# Altium PCB MainBoardPCB_4.PcbDoc (part 31 of 32)
Units mm, origin at the board's own origin, x right, y up, seen from the top; angles counter-clockwise.
Board outline 333.63 x 349.38 mm, 16 copper layers (L1, L2 (GND), L3 (Sign), L4 (GND), L5 (Sign), L6 (PWR/GND), L7(PWR/GND), L8 (Plane_GND), L9 (PWR/GND), L10 (PWR/GND), L11 (PWR/GND), L12 (Sign), L13 (GND), L14 (Sign), L15 (GND), L16), stack 2.502 mm thick; 2205 components, 1648 nets, 8314 pads, 3172 vias.
Unrouted connection lines stored in the file: 5141.
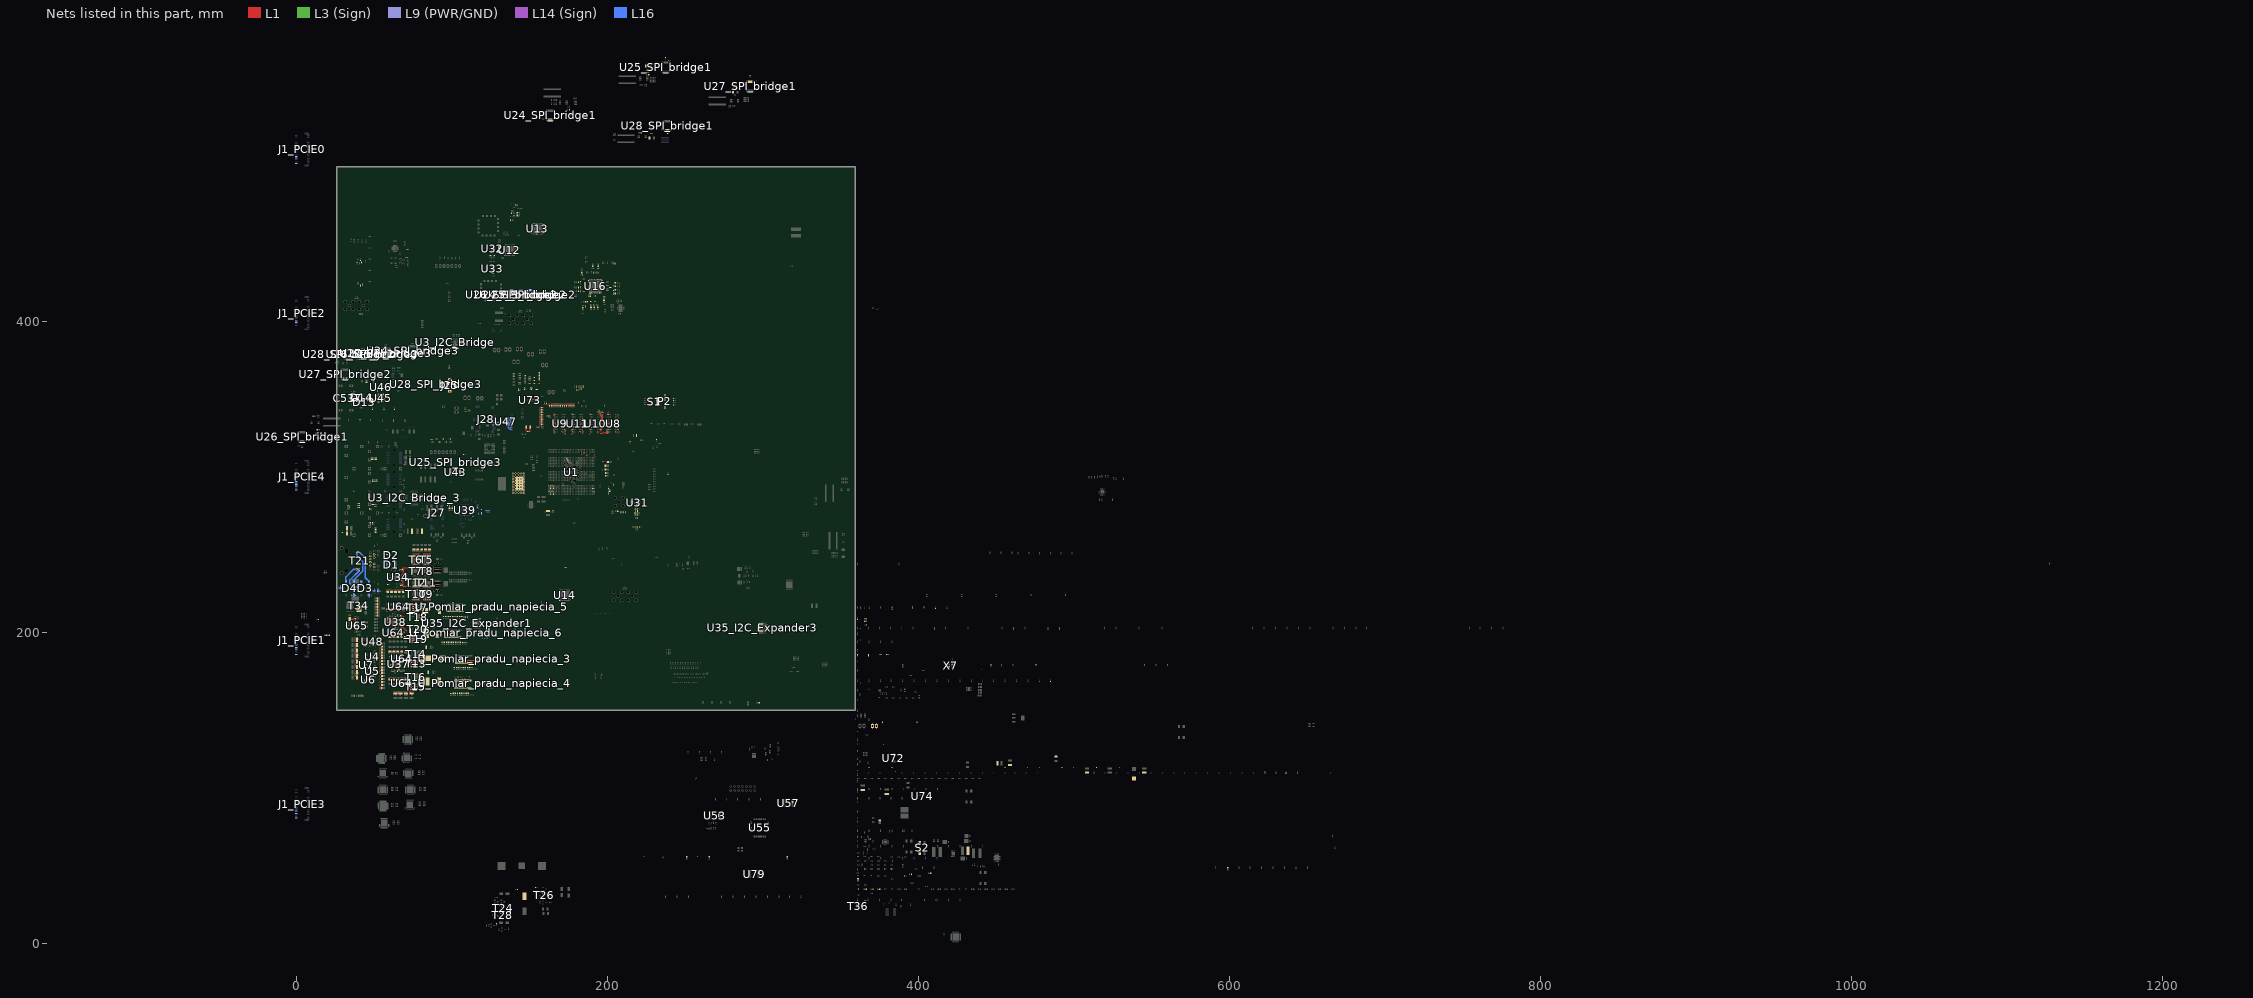
[diagram p31: the nets of this part, all layers, seen from the top]

## Via types
v1: diameter 0.5, hole 0.2, L1 to L16, tented both sides, 1153 vias
v2: diameter 0.5/0.35/0.35/0.35/0.35/0.35/0.35/0.35/0.35/0.35/0.35/0.35/0.35/0.35/0.35/0.5 (per signal layer), hole 0.2, L1 to L16, tented both sides, 548 vias
v3: diameter 0.5, hole 0.2, L1 to L16, 522 vias
v4: diameter 0.5/0.35/0.35/0.35/0.35/0.35/0.35/0.35/0.35/0.35/0.35/0.35/0.35/0.35/0.35/0.5 (per signal layer), hole 0.15, L1 to L16, tented both sides, 266 vias
v5: diameter 0.8, hole 0.4, L1 to L16, tented both sides, 164 vias
v6: diameter 0.35/0/0.35 (per signal layer), hole 0.127, L1 to L3 (Sign), tented both sides, 132 vias
v7: diameter 2.54, hole 1.02, L1 to L16, 125 vias
v8: diameter 1.4, hole 0.5, L1 to L16, tented both sides, 80 vias
v9: diameter 0.35, hole 0.127, L1 to L2 (GND), tented both sides, 36 vias
v10: diameter 0.4, hole 0.2, L1 to L16, 16 vias
v11: diameter 0.25, hole 0.2, L1 to L16, 16 vias
v12: diameter 5, hole 3, L1 to L16, 15 vias
v13: diameter 0.3, hole 0.2, L1 to L16, 15 vias
v14: diameter 0.45, hole 0.15, L1 to L16, 12 vias
v15: diameter 0.5/0.35/0.35/0.35/0.35/0.35/0.35/0.35/0.35/0.35/0.35/0.35/0.35/0.35/0.35/0.45 (per signal layer), hole 0.15, L1 to L16, tented both sides, 10 vias
v16: diameter 0.2/0/0.2 (per signal layer), hole 0.1, L1 to L3 (Sign), tented both sides, 9 vias
v17: diameter 0.4, hole 0.1, L1 to L16, 7 vias
v18: diameter 0.5, hole 0.2, L3 (Sign) to L6 (PWR/GND), tented both sides, 6 vias
v19: diameter 1.65, hole 1.65, L1 to L16, 6 vias
v20: diameter 1.15, hole 1.15, L1 to L16, 6 vias
v21: diameter 0.35/0/0.35 (per signal layer), hole 0.127, L14 (Sign) to L16, tented both sides, 5 vias
v22: diameter 0.2, hole 0.1, L1 to L16, 4 vias
v23: diameter 0.4, hole 0.2, L1 to L16, tented both sides, 2 vias
v24: diameter 0.4, hole 0.15, L1 to L16, 2 vias
v25: diameter 0.508, hole 0.127, L1 to L2 (GND), 2 vias
v26: diameter 0.508, hole 0.127, L2 (GND) to L3 (Sign), 2 vias
v27: diameter 0.5/0.35/0.35/0.35/0.35/0.35/0.35/0.35/0.35/0.35/0.35/0.35/0.35/0.35/0.35/0.5 (per signal layer), hole 0.15, L1 to L16, 2 vias
v28: diameter 0.35, hole 0.127, L3 (Sign) to L6 (PWR/GND), tented both sides, 2 vias
v29: diameter 5.5, hole 3.5, L1 to L16, 1 vias
v30: diameter 0.5/0.35/0.35/0.35/0.35/0.35/0.35/0.35/0.35/0.35/0.35/0.35/0.35/0.35/0.35/0.5 (per signal layer), hole 0.2, L1 to L16, 1 vias
v31: diameter 0.35/0.35/0.35 (per signal layer), hole 0.127, L1 to L3 (Sign), tented both sides, 1 vias
v32: diameter 0.45/0/0.45 (per signal layer), hole 0.15, L1 to L3 (Sign), tented both sides, 1 vias
v33: diameter 0.45/0/0.45 (per signal layer), hole 0.2, L14 (Sign) to L16, tented both sides, 1 vias
v34: diameter 0.35, hole 0.127, L2 (GND) to L3 (Sign), 1 vias
v35: diameter 0.35, hole 0.127, L1 to L2 (GND), 1 vias

## Nets (pads, with @x,y where several pads share a name; then routed paths per layer and width w, separated by ;. In a path a pad name is that pad's centre, name@x,y a point inside that pad or via, vN(x,y) a via of type N, cw(c..) or ccw(c..) an arc to the next point about the centre after c; other vN are vias at no path point) (continued)
PWR_OUT_20V: C347.2 C348.2 C352.2 C353.2 C371.2 C372.2 C373.2 C374.2 C375.2 C376.2 C391.1 C392.2 C396.2 C397.1 C400.2 C401.2 C402.2 C403.2 C404.2 C405.2 C432.1 C433.2 C437.2 C438.1 C441.2 C442.2 C443.2 C444.2 C445.2 C446.2 C766.1 C767.1 C768.1 C769.1 C770.2 C771.2 C772.2 C773.2 C774.2 C775.2 C776.2 C777.2 C778.2 C779.2 C780.2 C781.2 R266.2 R268.1 R285.1 R303.1 R612.2 R614.2 R621.2 R622.2 R628.2 R686.2 T5.5 T5.6 T5.7 T5.8 T6.5 T6.6 T6.7 T6.8 T9.5 T9.6 T9.7 T9.8 T10.5 T10.6 T10.7 T10.8 T13.5 T13.6 T13.7 T13.8 T15.5 T15.6 T15.7 T15.8 T17.5 T17.6 T17.7 T17.8 T19.5 T19.6 T19.7 T19.8 U48.1 U48.8 | length 169.6
  L1 w0.5: C780.2@52.066,210.593 v1(53.153,210.593) ; C780.2@52.066,211.317 v1(53.153,211.317) ; C779.2@52.066,212.488 v1(53.153,212.488) ; C779.2@52.066,213.212 v1(53.153,213.212) ; C778.2@52.066,214.297 v1(53.153,214.297) ; C778.2@52.066,215.021 v1(53.153,215.021) ; C777.2@52.067,216.111 v1(53.154,216.111) ; C777.2@52.066,216.835 v1(53.153,216.835) ; C776.2@52.066,217.856 v1(53.153,217.856) ; C776.2@52.066,218.58 v1(53.153,218.58) ; C775.2@52.066,219.678 v1(53.153,219.678) ; C775.2@52.066,220.402 v1(53.153,220.402) ; C774.2@52.066,221.492 v1(53.153,221.492) ; C774.2@52.066,222.216 v1(53.153,222.216) ; C392.2@58.13,226.088 v1(58.13,227.175) ; v1(58.214,213.896) C397.1@58.214,214.983 ; C392.2@58.776,226.088 v1(58.776,227.175) ; v1(58.852,213.896) C397.1@58.852,214.983 ; C392.2@59.413,226.088 v1(59.413,227.175) ; v1(59.497,213.896) C397.1@59.497,214.983 ; C433.2@59.63,169.623 v1(59.63,170.71) ; C353.2@59.645,197.03 v1(59.645,198.117) ; v1(59.653,186.744) C438.1@59.653,187.831 ; C433.2@60.276,169.623 v1(60.276,170.71) ; v1(60.29,186.744) C438.1@60.29,187.831 ; C353.2@60.29,197.03 v1(60.29,198.117) ; C391.1@60.612,226.088 v1(60.612,227.175) ; v1(60.696,213.896) C396.2@60.696,214.983 ; C433.2@60.913,169.623 v1(60.913,170.71) ; C353.2@60.928,197.03 v1(60.928,198.117) ; v1(60.935,186.744) C438.1@60.935,187.831 ; C391.1@61.258,226.088 v1(61.258,227.175) ; v1(61.334,213.896) C396.2@61.334,214.983 ; C391.1@61.895,226.088 v1(61.895,227.175) ; v1(61.979,213.896) C396.2@61.979,214.983 ; C432.1@62.112,169.623 v1(62.112,170.71) ; C352.2@62.127,197.03 v1(62.127,198.117) ; v1(62.135,186.744) C437.2@62.135,187.831 ; C769.1@62.575,160.649 v1(62.575,161.736) ; C432.1@62.758,169.623 v1(62.758,170.71) ; v1(62.772,186.744) C437.2@62.772,187.831 ; C352.2@62.772,197.03 v1(62.772,198.117) ; C405.2@63.094,226.087 v1(63.094,227.174) ; v1(63.124,159.562) C769.1@63.124,160.649 ; v1(63.179,213.896) C402.2@63.179,214.983 ; C432.1@63.395,169.623 v1(63.395,170.71) ; C352.2@63.41,197.03 v1(63.41,198.117) ; v1(63.417,186.744) C437.2@63.417,187.831 ; C769.1@63.68,160.649 v1(63.68,161.736) ; C405.2@63.74,226.087 v1(63.74,227.174) ; v1(63.816,213.896) C402.2@63.816,214.983 ; v1(64.229,159.562) C769.1@64.229,160.649 ; C405.2@64.377,226.087 v1(64.377,227.174) ; v1(64.461,213.896) C402.2@64.461,214.983 ; C446.2@64.594,169.623 v1(64.594,170.71) ; C374.2@64.609,197.03 v1(64.609,198.117) ; v1(64.617,186.744) C443.2@64.617,187.831 ; C769.1@64.777,160.649 v1(64.777,161.736) ; C446.2@65.24,169.623 v1(65.24,170.71) ; v1(65.254,186.744) C443.2@65.254,187.831 ; C374.2@65.254,197.03 v1(65.254,198.117) ; C404.2@65.576,226.087 v1(65.576,227.174) ; v1(65.661,213.896) C401.2@65.661,214.983 ; C446.2@65.877,169.623 v1(65.877,170.71) ; C374.2@65.892,197.03 v1(65.892,198.117) ; v1(65.899,186.744) C443.2@65.899,187.831 ; C768.1@65.979,160.649 v1(65.979,161.736) ; C404.2@66.222,226.087 v1(66.222,227.174) ; v1(66.298,213.896) C401.2@66.298,214.983 ; v1(66.527,159.563) C768.1@66.527,160.649 ; C404.2@66.859,226.087 v1(66.859,227.174) ; v1(66.943,213.896) C401.2@66.943,214.983 ; C445.2@67.076,169.623 v1(67.076,170.71) ; C768.1@67.084,160.649 v1(67.084,161.736) ; C371.2@67.091,197.03 v1(67.091,198.117) ; v1(67.099,186.744) C442.2@67.099,187.831 ; v1(67.632,159.563) C768.1@67.632,160.649 ; C445.2@67.722,169.623 v1(67.722,170.71) ; v1(67.736,186.744) C442.2@67.736,187.831 ; C371.2@67.736,197.03 v1(67.736,198.117) ; C403.2@68.058,226.057 v1(68.058,227.144) ; v1(68.143,213.866) C400.2@68.143,214.953 ; C768.1@68.181,160.649 v1(68.181,161.736) ; C445.2@68.359,169.623 v1(68.359,170.71) ; C371.2@68.374,197.03 v1(68.374,198.117) ; v1(68.382,186.744) C442.2@68.382,187.831 ; C403.2@68.704,226.057 v1(68.704,227.144) ; v1(68.78,213.866) C400.2@68.78,214.953 ; C403.2@69.341,226.057 v1(69.341,227.144) ; C767.1@69.419,160.65 v1(69.419,161.737) ; v1(69.425,213.866) C400.2@69.425,214.953 ; C444.2@69.558,169.592 v1(69.558,170.679) ; C376.2@69.573,196.999 v1(69.573,198.086) ; v1(69.581,186.713) C441.2@69.581,187.8 ; v1(69.967,159.563) C767.1@69.967,160.65 ; C444.2@70.204,169.592 v1(70.204,170.679) ; v1(70.218,186.713) C441.2@70.218,187.8 ; C376.2@70.218,196.999 v1(70.218,198.086) ; C767.1@70.524,160.65 v1(70.524,161.737) ; C444.2@70.841,169.592 v1(70.841,170.679) ; C376.2@70.856,196.999 v1(70.856,198.086) ; v1(70.864,186.713) C441.2@70.864,187.8 ; v1(71.072,159.563) C767.1@71.072,160.65 ; C767.1@71.621,160.65 v1(71.621,161.737) ; v1(72.877,163.201) T15.8@73.964,163.201 ; v1(72.877,164.471) T15.7@73.964,164.471 ; v1(72.877,165.741) T15.6@73.964,165.741 ; v1(72.877,167.011) T15.5@73.964,167.011 ; C766.1@72.887,160.649 v1(72.887,161.736) ; v1(73.13,178.003) T13.8@74.217,178.003 ; v1(73.13,179.273) T13.7@74.217,179.273 ; v1(73.13,180.543) T13.6@74.217,180.543 ; v1(73.13,181.813) T13.5@74.217,181.813 ; v1(73.435,159.562) C766.1@73.435,160.649 ; C766.1@73.992,160.649 v1(73.992,161.736) ; v1(74.017,193.746) T19.8@75.104,193.746 ; v1(74.017,195.016) T19.7@75.104,195.016 ; v1(74.017,196.286) T19.6@75.104,196.286 ; v1(74.017,197.556) T19.5@75.104,197.556 ; v1(74.086,214.079) T17.8@75.173,214.079 ; v1(74.086,215.349) T17.7@75.173,215.349 ; v1(74.086,216.619) T17.6@75.173,216.619 ; v1(74.086,217.889) T17.5@75.173,217.889 ; v1(74.54,159.562) C766.1@74.54,160.649 ; v1(74.991,252.289) C348.2@74.991,253.376 ; T6.8@75.072,249.548 v1(75.072,250.635) ; v1(75.078,220.589) T10.5@75.078,221.676 ; C766.1@75.088,160.649 v1(75.088,161.736) ; v1(75.629,252.289) C348.2@75.629,253.376 ; v1(76.274,252.289) C348.2@76.274,253.376 ; T6.7@76.342,249.548 v1(76.342,250.635) ; v1(76.348,220.589) T10.6@76.348,221.676 ; v1(77.473,252.289) C347.2@77.473,253.376 ; T6.6@77.612,249.548 v1(77.612,250.635) ; v1(77.618,220.589) T10.7@77.618,221.676 ; v1(78.111,252.289) C347.2@78.111,253.376 ; v1(78.756,252.289) C347.2@78.756,253.376 ; T6.5@78.882,249.548 v1(78.882,250.635) ; v1(78.888,220.589) T10.8@78.888,221.676 ; v1(79.955,252.288) C372.2@79.955,253.375 ; v1(80.593,252.288) C372.2@80.593,253.376 ; v1(81.238,252.288) C372.2@81.238,253.375 ; v1(82.072,220.589) T9.5@82.072,221.676 ; T5.8@82.072,249.548 v1(82.072,250.635) ; v1(82.437,252.288) C375.2@82.437,253.375 ; v1(83.075,252.288) C375.2@83.075,253.376 ; v1(83.342,220.589) T9.6@83.342,221.676 ; T5.7@83.342,249.548 v1(83.342,250.635) ; v1(83.72,252.288) C375.2@83.72,253.375 ; v1(84.612,220.589) T9.7@84.612,221.676 ; T5.6@84.612,249.548 v1(84.612,250.635) ; v1(84.919,252.258) C373.2@84.919,253.345 ; v1(85.557,252.258) C373.2@85.557,253.345 ; v1(85.882,220.589) T9.8@85.882,221.676 ; T5.5@85.882,249.548 v1(85.882,250.635) ; v1(86.202,252.258) C373.2@86.202,253.345
  other v1: 74.782,163.22 76.034,163.22 77.285,163.22 74.782,164.471 76.034,164.471 77.285,164.471 74.782,165.723 76.034,165.723 77.285,165.723 74.782,166.975 76.034,166.975 77.285,166.975 75.035,178.022 76.287,178.022 77.539,178.022 75.035,179.273 76.287,179.273 77.539,179.273 75.035,180.525 76.287,180.525 77.539,180.525 75.035,181.777 76.287,181.777 77.539,181.777 75.922,193.764 77.173,193.764 78.425,193.764 75.922,195.016 77.173,195.016 78.425,195.016 75.922,196.267 77.173,196.267 78.425,196.267 75.922,197.519 77.173,197.519 78.425,197.519 75.991,214.097 77.243,214.097 78.495,214.097 75.991,215.349 77.243,215.349 78.495,215.349 75.991,216.6 77.243,216.6 78.495,216.6 75.991,217.852 77.243,217.852 78.495,217.852 75.114,222.494 76.366,222.494 77.618,222.494 78.869,222.494 82.108,222.494 83.36,222.494 84.612,222.494 85.863,222.494 75.114,223.745 76.366,223.745 77.618,223.745 78.869,223.745 82.108,223.745 83.36,223.745 84.612,223.745 85.863,223.745 75.114,224.997 76.366,224.997 77.618,224.997 78.869,224.997 82.108,224.997 83.36,224.997 84.612,224.997 85.863,224.997 75.09,246.226 76.342,246.226 77.593,246.226 78.845,246.226 82.09,246.226 83.342,246.226 84.593,246.226 85.845,246.226 75.09,247.478 76.342,247.478 77.593,247.478 78.845,247.478 82.09,247.478 83.342,247.478 84.593,247.478 85.845,247.478 75.09,248.73 76.342,248.73 77.593,248.73 78.845,248.73 82.09,248.73 83.342,248.73 84.593,248.73 85.845,248.73
  other v5: 50.447,190.32 49.788,191.057 49.2,191.821 50.448,191.822 49.2,196.145 50.448,196.145 49.788,196.91 50.447,197.647
  other v10: 49.027,193.583 49.027,194.383
PWR_Switch1_En: U6.A2 U35_I2C_Expander1.3
PWR_Switch1_Flag: U35_I2C_Expander1.2
PWR_Switch2_En: U7.A2 U35_I2C_Expander1.22
PWR_Switch2_Flag: U35_I2C_Expander1.18
PWR_SwitchR1_Flag: R29.1 U6.A3
PWR_SwitchR2_Flag: R30.1 U7.A3
RAM_DDR4_VTT: C722.2 C723.2 R31.2 R32.2 R33.2 R34.2 R35.2 R36.2 R37.2 R38.2 R39.2 R40.2 R41.2 R42.2 R43.2 R44.2 R45.2 R46.2 R47.2 R48.2 R49.2 R50.2 R51.2 R53.2 R55.2 R57.2 R59.2 R689.1 U73.8 | length 34.8
  L1 w0.25: v1(156.593,333.611) R46.2@157.837,333.611 ; v1(156.593,334.7) R59.2@157.837,334.7 ; v1(156.593,335.789) R51.2@157.837,335.789 ; v1(156.593,336.878) R57.2@157.837,336.878 ; v1(156.593,337.967) R37.2@157.837,337.967 ; v1(156.593,339.056) R34.2@157.837,339.055 ; v1(156.593,340.144) R33.2@157.837,340.144 ; v1(156.593,341.233) R41.2@157.837,341.233 ; v1(156.593,342.322) R48.2@157.837,342.322 ; v1(156.593,343.411) R45.2@157.837,343.411 ; v1(156.593,344.5) R53.2@157.837,344.5 ; R38.2@162.769,345.7 v1(162.769,346.944) ; R44.2@163.977,345.7 v1(163.977,346.944) ; R55.2@165.186,345.7 v1(165.186,346.944) ; R40.2@166.395,345.7 v1(166.395,346.944) ; R36.2@167.603,345.7 v1(167.603,346.944) ; R49.2@168.812,345.7 v1(168.812,346.944) ; R32.2@170.02,345.7 v1(170.02,346.944) ; R39.2@171.229,345.7 v1(171.229,346.944) ; R42.2@172.438,345.7 v1(172.438,346.944) ; R35.2@173.646,345.7 v1(173.646,346.944) ; R31.2@174.855,345.7 v1(174.855,346.944) ; R50.2@176.063,345.7 v1(176.063,346.944) ; R47.2@177.272,345.7 v1(177.272,346.944) ; R43.2@178.481,345.7 v1(178.481,346.944)
  L1 w0.3: U73.8@151.644,349.985 v1(152.387,349.985) ; C722.2@153.683,349.532 v1(153.683,350.275) ; C723.2@154.673,349.532 v1(154.673,350.275) ; v1(158.909,347.162) 159.652,347.162 ; R689.1@160.795,347.112 v1(161.538,347.112)
RAM_Vcc1V2: C36.2 C220.1 C222.1 C223.2 C224.2 C225.2 C226.2 C227.2 C228.2 C229.2 C230.2 C231.2 C232.2 C233.2 C234.2 C235.2 C236.2 C237.2 C238.2 C239.2 C240.2 C241.2 C242.2 C244.1 C246.1 C247.2 C248.2 C249.2 C250.2 C251.2 C252.2 C253.2 C254.2 C255.2 C256.2 C257.2 C258.2 C259.2 C260.2 C261.2 C262.2 C263.2 C264.2 C265.2 C266.2 C741.2 C760.1 C761.2 R58.2 R165.2 R166.2 R169.2 R171.2 R297.2 R448_U_Pomiar_pradu_napiecia_4.2 R695.1 U1.A6 U1.B8 U1.C6 U1.D8 U1.E6 U1.G6 U1.J6 U1.L6 U1.M25 U1.N6 U1.R6 U1.T18 U1.T20 U1.T21 U1.U6 U8.A1 U8.A6 U8.B3 U8.B6 U8.C1 U8.D1 U8.D6 U8.F2 U8.F5 U8.G1 U8.G4 U8.G6 U8.J1 U8.J2 U8.J5 U8.J6 U8.L1 U8.L6 U8.R1 U8.T6 U9.A1 U9.A6 U9.B3 U9.B6 U9.C1 U9.D1 U9.D6 U9.F2 U9.F5 U9.G1 U9.G4 U9.G6 U9.J1 U9.J2 U9.J5 U9.J6 U9.L1 U9.L6 U9.R1 U9.T6 U10.A1 U10.A6 U10.B3 U10.B6 U10.C1 U10.D1 U10.D6 U10.F2 U10.F5 U10.G1 U10.G4 U10.G6 U10.J1 U10.J2 U10.J5 U10.J6 U10.L1 U10.L6 U10.R1 U10.T6 U11.A1 U11.A6 U11.B3 U11.B6 U11.C1 U11.D1 U11.D6 U11.F2 U11.F5 U11.G1 U11.G4 U11.G6 U11.J1 U11.J2 U11.J5 U11.J6 U11.L1 U11.L6 U11.R1 U11.T6 U64_U_Pomiar_pradu_napiecia_4.8 U64_U_Pomiar_pradu_napiecia_4.9 | length 89
  L1 w0.2: v4(189.4,334.057) v4@189.4,334.064 ; v1(198.412,328.613) 198.964,328.06 U8.A6@200.457,328.06 ; v1(199.479,328.887) 200.43,328.887 U8.B6@200.457,328.86 ; v1(199.657,330.225) 199.892,330.46 U8.D6@200.457,330.46 ; U8.G4@202.057,332.86 202.215,332.702 v4(202.757,332.702) ; U8.J2@206.057,334.46 206.18,334.337 206.734,334.337 U8.J1@206.857,334.46 v4(207.261,334.864) ; U8.A1@206.857,328.06 v4(207.785,328.06) ; U8.C1@206.857,329.66 v4(207.785,329.66) ; U8.D1@206.857,330.46 v4(207.785,330.46) ; U8.G1@206.857,332.86 v4(207.428,332.86) ; U8.L1@206.857,336.06 v4(207.261,336.464) ; U8.R1@206.857,339.26 v4(207.261,339.664)
  L1 w0.25: v1(154.724,331.965) C36.2@155.566,331.965 ; v1(161.216,339.242) R58.2@162.46,339.242 ; v4(165.672,328.464) U9.A6@166.076,328.06 ; v4(165.672,329.264) U9.B6@166.076,328.86 ; v4(165.672,330.064) 166.076,329.66 ; v4(165.672,330.864) U9.D6@166.076,330.46 ; v4(165.672,331.664) 166.076,331.26 ; v4(165.672,333.264) U9.G6@166.076,332.86 ; v4(165.672,334.864) U9.J6@166.076,334.46 U9.J5@166.876,334.46 ; v4(165.672,336.464) U9.L6@166.076,336.06 ; v4(165.672,337.264) 166.076,336.86 ; v4(165.672,339.664) 166.076,339.26 ; v4(165.672,340.464) U9.T6@166.076,340.06 ; v4(166.472,330.864) 166.876,330.46 ; v4(166.472,331.664) 166.876,331.26 ; v4(166.472,332.457) 166.876,332.86 ; U9.F5@166.876,332.06 v4(167.279,332.464) ; v4(167.272,333.264) U9.G4@167.676,332.86 ; v4(170.472,328.457) U9.B3@170.876,328.86 ; v4(171.272,334.057) U9.J2@171.676,334.46 ; U9.F2@171.676,332.06 172.876,333.261 v4(172.923,333.261) ; U9.A1@172.476,328.06 v4(172.879,327.657) ; U9.C1@172.476,329.66 v4(172.879,329.257) ; U9.D1@172.476,330.46 v4(172.879,330.057) ; U9.J1@172.476,334.46 v4(172.879,334.864) ; v4(176.95,336.055) U11.L6@177.521,336.055 ; v4(177.133,327.657) U11.A6@177.536,328.06 ; v4(177.133,328.457) U11.B6@177.536,328.86 ; v4(177.133,330.057) U11.D6@177.536,330.46 ; v4(177.133,332.457) U11.G6@177.536,332.86 ; v4(177.133,334.057) U11.J6@177.536,334.46 ; v4(177.133,340.464) U11.T6@177.536,340.06 ; v4(177.933,331.657) U11.F5@178.336,332.06 ; v4(177.933,334.057) U11.J5@178.336,334.46 ; U11.G4@179.136,332.86 v4(179.54,332.457) ; v4(181.933,328.457) U11.B3@182.336,328.86 ; v4(182.733,331.657) U11.F2@183.136,332.06 ; v4(182.733,334.057) U11.J2@183.136,334.46 ; 183.451,345.211 v4(183.855,345.615) ; U11.A1@183.936,328.06 v4(184.507,328.06) ; U11.C1@183.936,329.66 v4(184.507,329.66) ; U11.D1@183.936,330.46 v4(184.507,330.46) ; U11.G1@183.936,332.86 v4(184.507,332.86) ; U11.J1@183.936,334.46 v4(184.34,334.864) ; U11.L1@183.936,336.06 v4(184.34,335.657) ; v4(188.593,327.657) U10.A6@188.997,328.06 ; v4(188.593,328.457) U10.B6@188.997,328.86 ; v4(188.593,330.864) U10.D6@188.997,330.46 ; v4(188.593,336.464) U10.L6@188.997,336.06 ; v4(188.593,340.464) U10.T6@188.997,340.06 ; U10.J6@188.997,334.46 v4(189.4,334.057) ; v4(189.393,332.464) U10.F5@189.797,332.06 ; v4@189.4,334.064 U10.J5@189.797,334.46 ; U10.G4@190.597,332.86 v4(191,332.457) ; U10.F2@194.597,332.06 U10.G1@195.397,332.86 ; U8.B3@205.257,328.86 v4(205.661,328.457)
  L1 w0.254: v1(198.031,332.524) 200.121,332.524 U8.G6@200.457,332.86 U8.F5@201.257,332.06 ; 200.203,341.884 200.457,341.63 U8.T6@200.457,340.06 ; U8.L6@200.457,336.06 199.439,336.06 198.847,335.469 v1(198.847,334.75) 199.326,334.75 199.615,334.46 U8.J6@200.457,334.46 200.727,334.73 200.987,334.73 U8.J5@201.257,334.46 ; U8.F2@206.057,332.06 U8.G1@206.857,332.86
  L1 w0.3: v1(193.116,328.384) 193.32,328.384 U10.B3@193.797,328.86 ; U10.J2@194.597,334.46 195.008,334.049 U10.J1@195.397,334.46 195.644,334.213 v1(195.77,334.213) ; U10.A1@195.397,328.06 196.956,328.06 v1(198.022,329.127) ; U10.C1@195.397,329.66 195.643,329.66 196.494,330.512 v1(196.494,331.178) 196.114,331.178 U10.D1@195.397,330.46 ; U10.G1@195.397,332.86 195.441,332.816 195.791,332.816 196.812,331.795 v1(196.812,331.762) ; U10.L1@195.397,336.06 196.172,336.06 197.039,336.927 v6(197.039,340.639) ; U10.R1@195.397,339.26 195.988,339.852 v6(196.026,339.852)
  L9 (PWR/GND) w0.254: v2(173.397,312.539) 173.901,312.035 173.901,311.315 174.18,311.036 174.587,311.036 174.892,310.731 174.892,309.26 175.173,308.978 176.958,308.978
  L3 (Sign) w0.3: v1(194.323,342.976) 194.694,342.605 194.694,341.572 195.22,341.046 195.567,341.046 196.026,340.587 v6@196.026,339.831 ; v1(195.568,341.757) 196.748,341.757 197.104,341.401 197.039,341.336 v6(197.039,340.639)
  L16 w0.2: v1@199.452,328.887 v1(199.479,328.887)
  L16 w0.254: v1(198.847,334.75) v1@198.897,334.75
  L16 w0.3: v1@193.116,328.325 v1(193.116,328.384)
  other v2: 162.397,293.539 164.397,293.539 166.397,293.539 168.397,293.539 170.397,293.539 172.397,293.539 174.397,293.539 176.397,293.539 178.397,293.539 163.397,295.539 165.397,295.539 177.397,305.539 177.397,307.539 177.397,308.539
  other v5: 112.047,170.186 110.249,170.206 108.45,170.226 104.854,170.267 106.652,170.246 103.056,170.287 101.258,170.307 111.158,171.095 109.36,171.115 105.763,171.156 107.561,171.135 103.965,171.176 102.167,171.196
RAM_VrefA: C221.1 R166.1 R168.1 U8.M1 | length 0.6
  L1 w0.2: U8.M1@206.857,336.86 v4(207.261,337.264)
RAM_VrefB: C243.1 R169.1 R170.1 U10.M1 | length 7.8
  L1 w0.2: v6(193.786,341.617) 194.952,341.617 196.417,340.153 196.417,337.357 195.92,336.86 U10.M1@195.397,336.86
  L3 (Sign) w0.2: v6(193.786,341.617) 193.786,342.141
RAM_VrefC: C219.1 R165.1 R167.1 U9.M1
RAM_VrefD: C245.1 R171.1 R172.1 U11.M1 | length 0.6
  L1 w0.25: U11.M1@183.936,336.86 v4(184.34,337.264)
RefClk_Si53323_N: R253.1 R255.2 U31.7
RefClk_Si53323_P: C341.2 R252.1 R254.2 U31.6
RESET_N: R712.1 R713.2 U39.43
RESETB: U45.27 U74.4
RST_brigde: R757.1 U3_I2C_Bridge_3.24
SD_Card_CLK: J28.5 U47.C5 | length 6.8
  L16 w0.098: J28.5@127.237,335.032 130.228,335.032 130.6,335.404 U47.C5@133.927,335.404
SD_Card_en: R382.1 U47.C2
SetClk_Si53323_2: T36.1 U1.K12
  other v2: 171.397,299.539
SFP0_ABS: R65.1
SFP0_LOS: R66.1 U35_I2C_Expander3.28
SFP0_RS0: R72.1 R74.2
SFP0_RS1: R71.1 R73.2
SFP0_Rx_N: U1.D5
SFP0_Rx_P: U1.D6
SFP0_Tx_N: U1.D1
SFP0_Tx_P: U1.D2
SFP0_TxDis: R68.1 U35_I2C_Expander3.27
SFP0_TxF: R67.1 U35_I2C_Expander3.26
SFP0_VccR: C37.2 C38.1 L1.2
SFP0_VccT: C39.2 C40.1 L2.2
SFP1_ABS: R135.1
SFP1_GND: R143.1 R144.1
SFP1_LOS: R136.1 U35_I2C_Expander3.4
SFP1_RS0: R142.1 R144.2
SFP1_RS1: R141.1 R143.2
SFP1_Rx_N: U1.C7
SFP1_Rx_P: U1.C8
SFP1_Tx_N: U1.C3
SFP1_Tx_P: U1.C4
SFP1_TxDis: R138.1 U35_I2C_Expander3.1
SFP1_TxF: R137.1 U35_I2C_Expander3.24
SFP2_ABS: R145.1
SFP2_GND: R153.1 R154.1
SFP2_LOS: R146.1 U35_I2C_Expander3.3
SFP2_RS0: R152.1 R154.2
SFP2_RS1: R151.1 R153.2
SFP2_Rx_N: U1.B5
SFP2_Rx_P: U1.B6
SFP2_Tx_N: U1.B1
SFP2_Tx_P: U1.B2
SFP2_TxDis: R148.1 U35_I2C_Expander3.17
SFP2_TxF: R147.1 U35_I2C_Expander3.19
SFP3_ABS: R155.1
SFP3_GND: R163.1 R164.1
SFP3_LOS: R156.1 U35_I2C_Expander3.21
SFP3_RS0: R162.1 R164.2
SFP3_RS1: R161.1 R163.2
SFP3_Rx_N: U1.A7
SFP3_Rx_P: U1.A8
SFP3_Tx_N: U1.A3
SFP3_Tx_P: U1.A4
SFP3_TxDis: R158.1 U35_I2C_Expander3.18
SFP3_TxF: R157.1 U35_I2C_Expander3.2
SFP_IO_nReset: R756.1 U35_I2C_Expander3.14
SGMI_C_Rx_N: C484.1
SGMI_C_Rx_P: C483.1
SGMI_C_Tx_N: C482.1
SGMI_C_Tx_P: C479.1
SGMI_CLK_Out_N: R320.1 R321.1 R326.2 U39.34
SGMI_CLK_Out_P: R319.1 R321.2 R325.2 U39.33
SGMI_Rx_N: C484.2 U39.28
SGMI_Rx_P: C483.2 U39.27
SGMI_Tx_N: C482.2 R323.1 R328.2 U39.36
SGMI_Tx_P: C479.2 R322.1 R327.2 U39.35
Si53323_1_Q1_N: C330.1 R249.1 U31.9
Si53323_1_Q1_P: C325.1 R246.2 U31.10
Si53323_1_Q2_LVDS_N: C725.2 R386.2 R387.2
Si53323_1_Q2_LVDS_P: C724.2
Si53323_1_Q2_N: R301.1 R385.2 U31.12
Si53323_1_Q2_P: R291.1 R384.2 U31.11
Si53323_2_CLK1_N: C330.2 R245.2 R248.2 R251.2 U32.4
Si53323_2_CLK1_P: C325.2 R245.1 R247.2 R250.2 U32.3
Si53323_2_Q1_N: C54.2 R537.2 U32.10
Si53323_2_Q1_P: C53.2 R536.1 U32.9
Si53323_2_Q2_LVDS_N: C727.2 R486.2 R487.2
Si53323_2_Q2_LVDS_P: C726.2
Si53323_2_Q2_N: R483.1 R485.2 U32.12
Si53323_2_Q2_P: R482.1 R484.2 U32.11
SMCLK_PCIE0: J1_PCIE0.26 R559_I2C_Bridge.1 U3_I2C_Bridge.2
SMCLK_PCIE1: J1_PCIE1.26 R227_I2C_Bridge.1 U3_I2C_Bridge.4
SMCLK_PCIE2: J1_PCIE2.26 R225_I2C_Bridge.1 U3_I2C_Bridge.6
SMCLK_PCIE3: J1_PCIE3.26 R223_I2C_Bridge.1 U3_I2C_Bridge.8
SMCLK_PCIE4: J1_PCIE4.26 R9_I2C_Bridge.1 U3_I2C_Bridge.11
SMDAT_PCIE0: J1_PCIE0.28 R560_I2C_Bridge.1 U3_I2C_Bridge.1
SMDAT_PCIE1: J1_PCIE1.28 R558_I2C_Bridge.1 U3_I2C_Bridge.3
SMDAT_PCIE2: J1_PCIE2.28 R226_I2C_Bridge.1 U3_I2C_Bridge.5
SMDAT_PCIE3: J1_PCIE3.28 R224_I2C_Bridge.1 U3_I2C_Bridge.7
SMDAT_PCIE4: J1_PCIE4.28 R10_I2C_Bridge.1 U3_I2C_Bridge.10
SPI1_CLK: 
SPI1_CLK: J25.1 R803.1 U15.14 U24_SPI_bridge2.3 U24_SPI_bridge3.3 U25_SPI_bridge2.3 U25_SPI_bridge3.3 U26_SPI_bridge2.3 U26_SPI_bridge3.3 U27_SPI_bridge2.3 U27_SPI_bridge3.3 U28_SPI_bridge2.3 U28_SPI_bridge3.3
SPI1_CS: J25.4 R123.1 R124.1 R806.1 U15.11 U24_SPI_bridge2.6 U24_SPI_bridge3.6 U25_SPI_bridge2.6 U25_SPI_bridge3.6 U26_SPI_bridge2.6 U26_SPI_bridge3.6 U27_SPI_bridge2.6 U27_SPI_bridge3.6 U28_SPI_bridge2.6 U28_SPI_bridge3.6
SPI1_MISO: J25.3 R807.1 U15.13 U24_SPI_bridge2.4 U24_SPI_bridge3.4 U25_SPI_bridge2.4 U25_SPI_bridge3.4 U26_SPI_bridge2.4 U26_SPI_bridge3.4 U27_SPI_bridge2.4 U27_SPI_bridge3.4 U28_SPI_bridge2.4 U28_SPI_bridge3.4
SPI1_MISO: U12.51 U26_SPI_bridge2.13
SPI1_MOSI: 
SPI1_MOSI: J25.2 R808.1 U15.12 U24_SPI_bridge2.5 U24_SPI_bridge3.5 U25_SPI_bridge2.5 U25_SPI_bridge3.5 U26_SPI_bridge2.5 U26_SPI_bridge3.5 U27_SPI_bridge2.5 U27_SPI_bridge3.5 U28_SPI_bridge2.5 U28_SPI_bridge3.5
SPI1_MOSI: U12.52 U26_SPI_bridge2.12
SPI2_CLK: U13.50 U25_SPI_bridge2.14
SPI2_MISO: U13.51 U25_SPI_bridge2.13
SPI2_MOSI: U13.52 U25_SPI_bridge2.12
SPI3_CLK: U14.50 U24_SPI_bridge2.14
SPI3_MISO: U14.51 U24_SPI_bridge2.13
SPI3_MOSI: U14.52 U24_SPI_bridge2.12
SPI_05028_CS: 
SPI_05028_CS: R125.2 R127.1 R139.2 R240_SPI_bridge2.1 U16.24 U28_SPI_bridge2.11
SPI_05028_MISO: R1.1 R2.2 R133.1 U16.60
SPI_6952_1_CS: 
SPI_6952_1_CS: R236_SPI_bridge2.1 U12.1 U26_SPI_bridge2.11
SPI_6952_2_CS: R233_SPI_bridge2.1 U13.1 U25_SPI_bridge2.11
SPI_6952_2_CS: 
SPI_6952_3_CS: R231_SPI_bridge2.1 U14.1 U24_SPI_bridge2.11
SPI_CLK_PCIE0: J1_PCIE0.22 U24_SPI_bridge1.14
SPI_CLK_PCIE1: J1_PCIE1.22 U25_SPI_bridge1.14
SPI_CLK_PCIE2: J1_PCIE2.22 U26_SPI_bridge1.14
SPI_CLK_PCIE3: J1_PCIE3.22 U27_SPI_bridge1.14
SPI_CLK_PCIE4: J1_PCIE4.22 U28_SPI_bridge1.14
SPI_CNV: 
SPI_DAC_CS: R236_SPI_bridge3.1 U26_SPI_bridge3.11 U30.14
SPI_DAC_CS: 
SPI_FPGA_CLK: U1.AB15 U15.3
  other v2: 183.397,302.539
SPI_FPGA_CS: R365.2 U1.AG13 U15.6
  other v2: 188.397,300.539
SPI_FPGA_MISO: U1.AD15 U15.4
  other v2: 185.397,302.539
SPI_FPGA_MOSI: U1.AE15 U15.5
  other v2: 186.397,302.539
SPI_FPGA_nOE: U15.9
SPI_MISO_PCIE0: J1_PCIE0.18 U24_SPI_bridge1.13
SPI_MISO_PCIE1: J1_PCIE1.18 U25_SPI_bridge1.13
SPI_MISO_PCIE2: J1_PCIE2.18 U26_SPI_bridge1.13
SPI_MISO_PCIE3: J1_PCIE3.18 U27_SPI_bridge1.13
SPI_MISO_PCIE4: J1_PCIE4.18 U28_SPI_bridge1.13
SPI_MOSI_PCIE0: J1_PCIE0.20 U24_SPI_bridge1.12
SPI_MOSI_PCIE1: J1_PCIE1.20 U25_SPI_bridge1.12
SPI_MOSI_PCIE2: J1_PCIE2.20 U26_SPI_bridge1.12
SPI_MOSI_PCIE3: J1_PCIE3.20 U27_SPI_bridge1.12
SPI_MOSI_PCIE4: J1_PCIE4.20 U28_SPI_bridge1.12
SPI_nCS_1_PCIE0: J1_PCIE0.16 R231_SPI_bridge1.1 U24_SPI_bridge1.11
SPI_nCS_1_PCIE1: J1_PCIE1.16 R233_SPI_bridge1.1 U25_SPI_bridge1.11
SPI_nCS_1_PCIE2: J1_PCIE2.16 R236_SPI_bridge1.1 U26_SPI_bridge1.11
SPI_nCS_1_PCIE3: J1_PCIE3.16 R238_SPI_bridge1.1 U27_SPI_bridge1.11
SPI_nCS_1_PCIE4: J1_PCIE4.16 R240_SPI_bridge1.1 U28_SPI_bridge1.11
SPI_nCS_2_PCIE0: J1_PCIE0.14
SPI_nCS_2_PCIE1: J1_PCIE1.14
SPI_nCS_2_PCIE2: J1_PCIE2.14
SPI_nCS_2_PCIE3: J1_PCIE3.14
SPI_nCS_2_PCIE4: J1_PCIE4.14
SPI_PCIE_SWITCH: 
SPI_RESET: 
SS1_1: C639.2 U37.28 | length 1.7
  L1 w0.254: U37.28@65.675,181.817 65.675,182.903 C639.2@66.141,183.369
SS1_2: C647.2 U38.28 | length 1.6
  L1 w0.254: U38.28@63.953,208.714 C647.2@63.953,210.264
SS2_1: C640.2 U37.13 | length 1.6
  L1 w0.254: U37.13@65.675,177.317 65.675,176.584 66.161,176.097 C640.2@66.161,175.893
SS2_2: C648.2 U38.13 | length 1.5
  L1 w0.254: C648.2@63.741,202.763 63.741,203.154 63.953,203.366 U38.13@63.953,204.214
SUSCLK: J27.60
SW1: C346.2 L9.1 R610.2 R613.2 T5.1 T5.2 T5.3 T6.1 T6.2 T6.3 T7.5 T7.6 T7.7 T7.8 T8.5 T8.6 T8.7 T8.8 U34.24 | length 18.8
  L1 w0.254: U34.24@67.322,237.139 67.657,237.139 69.236,238.718 69.236,240.156 68.922,240.47 C346.2@68.336,240.47 ; R610.2@67.378,240.47 C346.2@68.336,240.47 ; 73.8,241.529 68.669,241.529 68.336,241.196 C346.2@68.336,240.47
  L1 w0.5: T6.1@75.072,243.723 v1(75.072,244.81) ; T6.2@76.342,243.723 v1(76.342,244.81) ; T6.3@77.612,243.723 v1(77.612,244.81) ; T5.1@82.072,243.723 v1(82.072,244.81) ; T5.2@83.342,243.723 v1(83.342,244.81) ; T5.3@84.612,243.723 v1(84.612,244.81)
  other v1: 88.711,238.28 89.517,238.28 90.322,238.28 91.128,238.28 91.934,238.28 92.74,238.28 75.09,238.992 76.342,238.992 77.593,238.992 78.845,238.992 82.09,238.992 83.342,238.992 84.593,238.992 85.845,238.992 88.711,239.086 89.517,239.086 90.322,239.086 91.128,239.086 91.934,239.086 92.74,239.086 88.711,239.892 89.517,239.892 90.322,239.892 91.128,239.892 91.934,239.892 92.74,239.892 75.09,240.244 76.342,240.244 77.593,240.244 78.845,240.244 82.09,240.244 83.342,240.244 84.593,240.244 85.845,240.244 88.711,240.697 89.517,240.697 90.322,240.697 91.128,240.697 91.934,240.697 92.74,240.697 75.09,241.496 76.342,241.496 77.593,241.496 78.845,241.496 82.09,241.496 83.342,241.496 84.593,241.496 85.845,241.496 88.711,241.503 89.517,241.503 90.322,241.503 91.128,241.503 91.934,241.503 92.74,241.503 88.711,242.309 89.517,242.309 90.322,242.309 91.128,242.309 91.934,242.309 92.74,242.309 89.212,244.228 90.018,244.228 90.823,244.228 91.629,244.228 92.435,244.228 88.788,244.811 89.594,244.811 90.4,244.811 91.206,244.811 92.011,244.811 92.817,244.811
SW1_1: C390.2 L11.1 R288.2 R619.2 T13.1 T13.2 T13.3 T14.5 T14.6 T14.7 T14.8 U37.24 | length 7.6
  L1 w0.5: T14.5@80.039,184.15 v1(81.126,184.15) ; T14.6@80.039,185.42 v1(81.126,185.42) ; T14.7@80.039,186.69 v1(81.126,186.69) ; T14.8@80.039,187.96 v1(81.126,187.96) ; T13.1@80.042,178.003 v1(81.129,178.003) ; T13.2@80.042,179.273 v1(81.129,179.273) ; T13.3@80.042,180.543 v1(81.129,180.543)
  other v1: 76.718,184.187 77.97,184.187 79.221,184.187 76.718,185.438 77.97,185.438 79.221,185.438 76.718,186.69 77.97,186.69 79.221,186.69 76.718,187.942 77.97,187.942 79.221,187.942
SW1_2: C431.2 L19.1 R306.2 R625.1 T17.1 T17.2 T17.3 T18.5 T18.6 T18.7 T18.8 U38.24 | length 11.2
  L1 w0.254: U38.24@65.953,208.214 67.293,208.214 67.758,208.68 C431.2@67.758,209.091 ; R625.1@67.001,210.879 67.377,210.879 67.781,210.475 C431.2@67.781,209.114 68.392,209.114 69.532,210.254 ; 77.166,206.68 77.677,207.192 77.677,207.477
  L1 w0.5: v1(79.911,214.079) T17.1@80.998,214.079 ; v1(79.911,215.349) T17.2@80.998,215.349 ; v1(79.911,216.619) T17.3@80.998,216.619
  other v1: 77.677,207.834 78.929,207.834 80.18,207.834 77.677,209.086 78.929,209.086 80.18,209.086 77.677,210.337 78.929,210.337 80.18,210.337 77.677,211.589 78.929,211.589 80.18,211.589
SW2: C350.2 L10.1 R611.2 R616.2 T9.1 T9.2 T9.3 T10.1 T10.2 T10.3 T11.5 T11.6 T11.7 T11.8 T12.5 T12.6 T12.7 T12.8 U34.17 | length 18.5
  L1 w0.254: R611.2@67.113,230.147 67.513,230.147 67.688,230.322 C350.2@68.072,230.322 ; U34.17@67.322,233.639 68.085,233.639 68.854,232.87 68.854,230.471 68.705,230.322 C350.2@68.072,230.322 ; C350.2@68.072,230.317 C350.2@68.072,230.322 ; 73.69,229.73 68.663,229.73 C350.2@68.072,230.322
  L1 w0.5: v1(76.348,226.414) T10.3@76.348,227.501 ; v1(77.618,226.414) T10.2@77.618,227.501 ; v1(78.888,226.414) T10.1@78.888,227.501 ; v1(83.342,226.414) T9.3@83.342,227.501 ; v1(84.612,226.414) T9.2@84.612,227.501 ; v1(85.882,226.414) T9.1@85.882,227.501
  other v1: 88.597,226.45 89.402,226.45 90.208,226.45 91.014,226.45 91.82,226.45 92.625,226.45 88.979,227.033 89.785,227.033 90.59,227.033 91.396,227.033 92.202,227.033 88.674,228.952 89.48,228.952 90.286,228.952 91.091,228.952 91.897,228.952 92.703,228.952 75.108,229.757 76.36,229.757 77.612,229.757 78.863,229.757 82.108,229.757 83.36,229.757 84.612,229.757 85.863,229.757 88.674,229.758 89.48,229.758 90.286,229.758 91.091,229.758 91.897,229.758 92.703,229.758 88.674,230.564 89.48,230.564 90.286,230.564 91.091,230.564 91.897,230.564 92.703,230.564 75.108,231.008 76.36,231.008 77.612,231.008 78.863,231.008 82.108,231.008 83.36,231.008 84.612,231.008 85.863,231.008 88.674,231.369 89.48,231.369 90.286,231.369 91.091,231.369 91.897,231.369 92.703,231.369 88.674,232.175 89.48,232.175 90.286,232.175 91.091,232.175 91.897,232.175 92.703,232.175 75.108,232.26 76.36,232.26 77.612,232.26 78.863,232.26 82.108,232.26 83.36,232.26 84.612,232.26 85.863,232.26 88.674,232.981 89.48,232.981 90.286,232.981 91.091,232.981 91.897,232.981 92.703,232.981
SW2_1: C394.2 L12.1 R298.2 R620.2 T15.1 T15.2 T15.3 T16.5 T16.6 T16.7 T16.8 U37.17 | length 7.6
  L1 w0.5: T15.1@79.789,163.201 v1(80.876,163.201) ; T15.2@79.789,164.471 v1(80.876,164.471) ; T15.3@79.789,165.741 v1(80.876,165.741) ; T16.5@79.835,169.38 v1(80.922,169.38) ; T16.6@79.835,170.65 v1(80.922,170.65) ; T16.7@79.835,171.92 v1(80.922,171.92) ; T16.8@79.835,173.19 v1(80.922,173.19)
  other v1: 76.514,169.417 77.766,169.417 79.017,169.417 76.514,170.668 77.766,170.668 79.017,170.668 76.514,171.92 77.766,171.92 79.017,171.92 76.514,173.172 77.766,173.172 79.017,173.172
SW2_2: C435.2 L20.1 R302.1 R316.2 T19.1 T19.2 T19.3 T20.5 T20.6 T20.7 T20.8 U38.17 | length 12.3
  L1 w0.254: U38.17@65.953,204.714 67.394,204.714 67.796,204.312 C435.2@67.796,203.864 ; R302.1@66.453,202.163 66.794,202.163 67.796,203.166 C435.2@67.796,203.864 ; 70.746,200.92 C435.2@67.796,203.864
  L1 w0.5: v1(79.842,193.746) T19.1@80.929,193.746 ; v1(79.842,195.016) T19.2@80.929,195.016 ; v1(79.842,196.286) T19.3@80.929,196.286
  other v1: 77.578,200.189 78.83,200.189 80.081,200.189 77.578,201.44 78.83,201.44 80.081,201.44 77.578,202.692 78.83,202.692 80.081,202.692 77.578,203.944 78.83,203.944 80.081,203.944
SYNC_PCIE0_N: J1_PCIE0.46
SYNC_PCIE0_P: J1_PCIE0.44
SYNC_PCIE1_N: J1_PCIE1.46
SYNC_PCIE1_P: J1_PCIE1.44
SYNC_PCIE2_N: J1_PCIE2.46
SYNC_PCIE2_P: J1_PCIE2.44
SYNC_PCIE3_N: J1_PCIE3.46
SYNC_PCIE3_P: J1_PCIE3.44
SYNC_PCIE4_N: J1_PCIE4.46
SYNC_PCIE4_P: J1_PCIE4.44
TD_A_N: D1.2 D1.7 T21.10 U39.2
TD_A_P: D1.1 D1.8 T21.11 U39.1
TD_B_N: D1.4 D1.5 T21.5 U39.5
TD_B_P: D1.3 D1.6 T21.4 U39.4
TD_C_N: D2.2 D2.7 T21.2 U39.8
TD_C_P: D2.1 D2.8 T21.3 U39.7
TD_D_N: D2.4 D2.5 T21.9 U39.11
TD_D_P: D2.3 D2.6 T21.8 U39.10
TRK1_1: U37.32
TRK1_2: U38.32
TRK2_1: U37.9
TRK2_2: U38.9
TTC_0: R810.1
TTC_3: R804.1
uart0_RxD: R779.1 U57.13
uart0_TxD: R778.1 U57.14
uart1_RxD: U1.AH13 U79.14
  other v2: 189.397,300.539
uart1_TxD: U1.AK13 U79.13
  other v2: 191.397,300.539
US+_DxN: R279.1 R286.1 U1.V15
  other v2: 179.397,302.539
US+_DxP: R282.1 R283.1 U1.V14
  other v2: 179.397,301.539
US+_GND_PS_ADC: C627.1 C628.1 FB39.2 U1.W21
  other v2: 180.397,308.539
US+_GNDADC: C629.1 C630.1 FB41.2 U1.R14 U1.U14 U1.U15
  other v2: 176.397,301.539 178.397,301.539 178.397,302.539
US+_MGTRref: R173.1 U1.K7
US+_MGTRref_K8: R695.2 U1.K8
  other v2: 171.397,295.539
US+_POR_OVE: R693.1 U1.Y6
  other v2: 181.397,293.539
US+_Pudc_B: R694.2 R696.1 U1.W7
  other v2: 180.397,294.539
US+_Vcc_PS_ADC: C627.2 C628.2 FB38.2 U1.W22 | length 1.8
  L1 w0.254: v1(198.768,309.397) 198.819,309.448 FB38.2@200.559,309.448
  other v2: 180.397,309.539
US+_Vcc_PS_Batt: B1.1 C747.1 C748.2 R276.1 U1.U20
  other v2: 178.397,307.539
US+_Vcc_PS_DDR_504: C616.2 C617.2 C618.2 C619.2 C620.2 C621.2 C622.2 C753.1 C754.2 C755.2 L18.2 R220.2 U1.AA24 U1.AB27 U1.AC25 U1.AD28 U1.AE26 U1.AG27 U1.AK26 | length 6.7
  L1 w0.116: v6(182.909,315.027) U1.AB27@183.397,314.539 ; v6(183.91,312.052) U1.AC25@184.397,312.539 ; v6(184.91,315.052) U1.AD28@185.397,315.539 ; U1.AE26@186.397,313.539 v6(186.884,314.027) ; v6(187.909,315.027) U1.AG27@188.397,314.539 ; U1.AK26@191.397,313.539 v6(191.884,314.027)
  L3 (Sign) w0.254: v6(182.909,315.027) v18@182.909,315.531 ; v6(183.91,312.052) v18@184.266,312.408 ; v6(184.91,315.052) v18@184.91,315.556 ; v18(187.897,315.544) 187.909,315.531 v6(187.909,315.027) ; v6(191.884,314.027) v18@192.241,313.671
  other v18: 184.266,312.427 192.259,313.67 182.897,315.544 184.897,315.569
US+_Vcc_PS_DDR_PLL: C631.2 C632.2 FB42.2 U1.U18 U1.U19
  other v2: 178.397,305.539 178.397,306.539
US+_Vcc_PS_IntFp: C738.1 C739.1 C740.2 C744.2 C745.2 C751.1 C752.2 C762.1 C763.2 R271.2 R617.2 U1.AA18 U1.AA20 U1.AA21 U1.AA22 U1.L11 U1.L13 U1.L17 U1.M12 U1.M14 U1.M16 U1.M18 U1.N11 U1.N13 U1.N15 U1.N17 U1.P12 U1.P14 U1.P16 U1.R10 U1.R11 U1.R13 U1.R17 U1.T9 U1.T10 U1.T12 U1.T16 U1.U8 U1.U9 U1.U10 U1.U11 U1.U13 U1.U17 U1.V8 U1.V10 U1.V12 U1.V16 U1.V17 U1.V18 U1.V19 U1.W11 U1.W13 U1.W15 U1.W17 U1.W19 U1.W20 U1.Y12 U1.Y14 U1.Y16 U1.Y17 U1.Y18 U1.Y19 U1.Y20 U1.Y22 U72.8 U72.9
  other v2: 178.397,295.539 179.397,295.539 177.397,296.539 178.397,296.539 176.397,297.539 177.397,297.539 178.397,297.539 179.397,297.539 172.397,298.539 174.397,298.539 176.397,298.539 178.397,298.539 180.397,298.539 173.397,299.539 175.397,299.539 177.397,299.539 179.397,299.539 181.397,299.539 172.397,300.539 174.397,300.539 176.397,300.539 178.397,300.539 180.397,300.539 173.397,301.539 175.397,301.539 181.397,301.539 174.397,302.539 180.397,302.539 173.397,303.539 175.397,303.539 177.397,303.539 179.397,303.539 181.397,303.539 172.397,304.539 174.397,304.539 176.397,304.539 178.397,304.539 179.397,304.539 180.397,304.539 181.397,304.539 173.397,305.539 179.397,305.539 181.397,305.539 182.397,305.539 179.397,306.539 180.397,306.539 181.397,306.539 180.397,307.539 181.397,307.539 182.397,307.539 182.397,308.539 181.397,309.539 182.397,309.539
  other v8: 142.777,289.801 144.53,289.801 146.282,289.801 139.272,289.801 141.025,289.801 139.272,291.554 141.025,291.554 142.777,291.554 144.53,291.554 146.282,291.554 142.777,293.306 144.53,293.306 146.282,293.306 139.272,293.306 141.025,293.306 139.272,295.059 141.025,295.059 142.777,295.059 144.53,295.059 146.282,295.059 142.777,296.812 144.53,296.812 146.282,296.812 139.272,296.812 141.025,296.812 139.272,298.564 141.025,298.564 142.777,298.564 144.53,298.564 146.282,298.564 142.777,300.317 144.53,300.317 146.282,300.317 139.272,300.317 141.025,300.317 139.272,302.07 141.025,302.07 142.777,302.069 144.53,302.069 146.282,302.069
US+_Vcc_PS_IntFpDDR: C764.1 C765.2
US+_VccADC: C629.2 C630.2 FB40.2 U1.R15
  other v2: 176.397,302.539
US+_VN: J29.1 U1.T15
  other v2: 177.397,302.539
US+_VP: J29.2 U1.T14
  other v2: 177.397,301.539
US_JTAG_CLK: U53.12
US_JTAG_TDI: U53.14
US_JTAG_TDO: U53.11
US_JTAG_TMS: U53.13
US_JTAG_Vcc: U53.15
US_PADI: C535.2 R374.1 U1.M21 X5.1 | length 3.5
  L1 w0.2: X5.1@147.843,332.125 X5.1@147.823,332.105 C535.2@147.823,330.314 147.823,329.597 148.198,329.222 R374.1@148.623,329.222
  other v2: 173.397,308.539
US_PADO: C536.2 R374.2 U1.N21 X5.2 | length 3.5
  L1 w0.2: R374.2@149.523,329.222 149.948,329.222 150.323,329.597 C536.2@150.323,330.314 X5.2@150.323,332.105
  other v2: 174.397,308.539
US_PS_DONE: R357.1 U1.N22 U43.6
  other v2: 174.397,309.539
US_PS_Err_Out: U1.R22 U43.3
  other v2: 176.397,309.539
US_PS_Err_Status: U1.R20 U43.4
  other v2: 176.397,307.539
US_PS_Init_B: R353.2 U1.N18 U43.5
  other v2: 174.397,305.539
US_PS_JTAG_TCK: R346.2 U1.L19
  other v2: 172.397,306.539
US_PS_JTAG_TDI: R347.2 U1.L20
  other v2: 172.397,307.539
US_PS_JTAG_TDO: U1.M20
  other v2: 173.397,307.539
US_PS_JTAG_TMS: R348.2 U1.L21
  other v2: 172.397,308.539
US_PS_Mode0: P2.4 R349.1 S1.1 U1.R18
  other v2: 176.397,305.539
US_PS_Mode2: P2.2 R351.1 S1.3 U1.P21
  other v2: 175.397,308.539
US_PS_Mode3: P2.1 R352.1 S1.4 U1.P22
  other v2: 175.397,309.539
US_PS_Prog_B: R356.2 R367.1 S2.1 S2.2 U1.M19
  other v2: 173.397,306.539
US_PS_Ref_Clk: R375.2 U1.P19
  other v2: 175.397,306.539
USB2_CLK: R362.2 U45.1
USB2_D0: R116.2 U45.3
USB2_D1: R117.2 U45.4
USB2_D2: R115.2 U45.5
USB2_D3: R119.2 U45.6
USB2_D4: R120.2 U45.7
USB2_D5: R121.2 U45.9
USB2_D6: R122.2 U45.10
USB2_D7: R802.1 U45.13
USB2_DIR: R800.1 U45.31
USB2_NXT: R801.1 U45.2
USB2_STP: R118.2 U45.29
USB_D_N: C537.2 D13.2 U45.19
USB_D_P: C537.3 D13.1 U45.18
USB_En_Vout: U45.17 U46.A2
USB_OSC_IN: C736.2 R491.1 U45.26 X7.1
USB_OSC_Out: C737.2 R491.2 U45.25 X7.3
USB_RS0: R376.1 U45.8
USB_RS1: R377.1 U45.11
USB_RS2: R378.1 U45.14
USB_RX_C_N: C537.5 C543.2 D14.1 D14.10
USB_RX_C_P: C537.6 C542.2 D14.2 D14.9
USB_RX_N: C543.1
USB_RX_P: C542.1
USB_TX_C_N: C537.8 C541.2 D14.4 D14.7
USB_TX_C_P: C537.9 C540.2 D14.5 D14.6
USB_TX_N: C541.1
USB_TX_P: C540.1
USB_Vbus: R490.1 U45.22
USB_Vdd33: C731.2 U45.20
USB_Vout: C538.2 C539.2 C734.2 FB26.1 R490.2 U46.C2 U46.D1 U46.D2 U46.E1 U46.E2 U46.F1 U46.F2
uSD_CLK: R96.2 R97.1 U47.C1 | length 2.8
  L16 w0.098: U47.C1@135.527,335.404 136.416,335.404 136.924,334.896 R96.2@138.087,334.896
uSD_CMD: R95.2 U47.D2 | length 5.4
  L14 (Sign) w0.098: v21(135.127,335.004) 136.067,335.004 137.004,334.067 v21(137.004,332.204)
  L16 w0.098: v21(137.004,332.204) 137.436,331.772 R95.2@138.087,331.772
uSD_D0: R87.2 U47.D1 | length 3.8
  L16 w0.098: U47.D1@135.527,335.004 135.824,335.004 136.719,334.109 136.719,333.577 137.483,332.814 R87.2@138.087,332.814
uSD_D1: R88.2 U47.E1 | length 5.5
  L16 w0.098: U47.E1@135.527,334.604 136.391,333.741 136.391,331.48 137.14,330.731 R88.2@138.087,330.731
uSD_D2: R89.2 U47.A1 | length 4.1
  L16 w0.098: U47.A1@135.527,336.204 135.527,337.474 136.073,338.021 R89.2@138.087,338.021
uSD_D3: R90.2 U47.B1 | length 2.6
  L16 w0.098: U47.B1@135.527,335.804 135.788,335.804 135.921,335.938 R90.2@138.087,335.938
uSD_D4: R91.2 U47.B2 | length 3.5
  L14 (Sign) w0.098: v21(135.127,335.804) 135.127,335.944 v21(136.099,336.916)
  L16 w0.098: v21(136.099,336.916) 136.167,336.916 136.23,336.979 R91.2@138.087,336.979
V_KEY: C609.2 R647.2 R648.1 R653.1 T24.1 T26.1 T28.1
V_PoE+: C595.2 C596.2 D3.1 D4.1 D27.1 R149.2 R324.2 T34.5 U65.18 | length 20.3
  L1 w0.254: R149.2@34.773,204.343 34.798,204.318 U65.18@36.92,204.318
  L16 w0.5: v5(27.345,228.551) C595.2@28.639,228.551 ; v5(28.639,229.845) C595.2@28.639,228.551 ; v5(29.932,228.551) C595.2@28.639,228.551 ; v5(35.686,223.896) D4.1@36.98,223.896 ; v5(36.98,225.19) D4.1@36.98,223.896 ; v5(38.274,223.896) D4.1@36.98,223.896 ; v5(45.554,223.832) D3.1@46.848,223.832 ; v5(46.848,222.539) D3.1@46.848,223.832 ; v5(46.848,225.126) D3.1@46.848,223.832 ; v5(48.141,223.832) D3.1@46.848,223.832 ; v5(48.998,226.657) R324.2@50.292,226.657 v5(50.292,227.951) ; v5(52.54,227.889) C596.2@52.54,226.595 v5(53.834,226.595)
VBB: C344.1 R257.1 U33.3 U33.4
VC1~: D3.4 T21.13 | length 21.6
  L16 w1: T21.13@40.432,251.716 44.386,247.762 44.386,235.194 D3.4@46.848,232.732
VC2~: D3.3 T21.14 | length 22.4
  L16 w1: T21.14@40.432,240.536 40.432,239.625 34.468,233.66 34.468,231.356 36.767,229.057 39.738,229.057 41.748,231.066 D3.3@41.748,232.732
VC3~: D4.4 T21.15 | length 22.8
  L16 w1: D4.4@36.98,232.796 36.98,233.601 42.608,239.23 42.608,245.567 38.972,249.203 T21.15@38.972,251.716
VC4~: D4.3 T21.16 | length 11.9
  L16 w1: D4.3@31.88,232.796 31.88,235.613 36.803,240.536 T21.16@38.972,240.536
Vcc_Aux_PCIE_PCIE0: C1_PCIE0.2 C2_PCIE0.2 C3_PCIE0.2 FB1_PCIE0.1 J1_PCIE0.2 J1_PCIE0.4
Vcc_Aux_PCIE_PCIE1: C1_PCIE1.2 C2_PCIE1.2 C3_PCIE1.2 FB1_PCIE1.1 J1_PCIE1.2 J1_PCIE1.4
Vcc_Aux_PCIE_PCIE2: C1_PCIE2.2 C2_PCIE2.2 C3_PCIE2.2 FB1_PCIE2.1 J1_PCIE2.2 J1_PCIE2.4
Vcc_Aux_PCIE_PCIE3: C1_PCIE3.2 C2_PCIE3.2 C3_PCIE3.2 FB1_PCIE3.1 J1_PCIE3.2 J1_PCIE3.4
Vcc_Aux_PCIE_PCIE4: C1_PCIE4.2 C2_PCIE4.2 C3_PCIE4.2 FB1_PCIE4.1 J1_PCIE4.2 J1_PCIE4.4
Vcc_CLK_Mux_Fine: C326.2 C327.2 C328.2 C329.2 FB23.2 R250.1 R251.1 R259.1 R260.1 R386.1 R486.1 R488.2 U31.5 U32.5
Vcc_SFP_0: R155.2 R156.2 R157.2 R158.2 R161.2 R162.2
VCCINT: C598.2 D26.2 R669.1 U65.4 U65.14 | length 8.4
  L1 w0.254: C598.2@37.846,208.912 38.26,208.498 U65.14@38.26,206.158 ; R669.1@38.887,200.831 39.26,201.204 U65.4@39.26,202.478
  L1 w0.5: D26.2@34.353,208.547 36.347,208.547 36.713,208.912 C598.2@37.846,208.912
VCCO_1: C398.2 R289.2 R293.1 R295.1 R296.1 U37.2 U37.4 | length 1
  L1 w0.254: R293.1@60.881,178.317 R289.2@60.881,179.317
VCCO_2: C439.2 R307.2 R310.1 R313.1 R314.1 U38.2 U38.4 | length 6.6
  L1 w0.254: R307.2@58.845,206.596 59.525,206.596 59.643,206.714 U38.4@61.453,206.714 ; C439.2@58.845,209.529 R310.1@58.845,208.526 60.003,208.526 60.815,207.714 U38.2@61.453,207.714
VDD_APLL1: C88.1 C110.2 FB13.2 U16.49
VDD_APLL2: C89.1 C127.2 FB15.2 U16.37
VDD_CLK_MUX_DIV_3.3V: C336.2 C337.2 C338.2 C340.2 FB24.2 U33.1 U33.8 U33.9 U33.12
VDD_DIG: C93.1 C165.2 C590.2 FB21.2 FB37.1 R1.2 R125.1 R127.2 R128.2 R366.1 R544.2 U16.8
VDD_IN0: C63.1 C101.2 FB8.2 U16.3
VDD_IN1: C64.1 C105.2 FB10.2 U16.16
VDD_IN2: C67.1 C109.2 FB12.2 U16.9
VDD_IN3: C70.1 C126.2 FB14.2 U16.4
VDD_TCXO: C92.1 C148.2 FB19.2 U16.19
VDD_XO: C90.1 C144.2 FB17.2 U16.42
VDDO_0: C75.1 C143.2 FB16.2 U16.21
VDDO_1: C76.1 C147.2 FB18.2 U16.25
VDDO_6: C77.1 C164.2 FB20.2 U16.59
VDDO_7: C81.1 C180.2 FB22.2 U16.63
VDDO_23: C82.1 C102.2 FB9.2 U16.30
VDDO_45: C83.1 C106.2 FB11.2 U16.50
VLDO: C544.2 R383.2 U47.B4
Vout1_1: C406.2 C407.2 C408.2 C409.2 C410.2 C411.2 C412.2 C413.2 C414.2 C415.2 C416.2 C417.2 L11.2 R448_U_Pomiar_pradu_napiecia_3.1 U64_U_Pomiar_pradu_napiecia_3.10 | length 10.2
  L1 w0.3: R448_U_Pomiar_pradu_napiecia_3.1@107.759,180.301 107.759,181.902 108.017,182.159 U64_U_Pomiar_pradu_napiecia_3.10@116.278,182.159
Vout1_2: C447.2 C448.2 C449.2 C450.2 C451.2 C452.2 C453.2 C454.2 C455.2 C456.2 C457.2 C458.2 L19.2 R448_U_Pomiar_pradu_napiecia_5.1 U64_U_Pomiar_pradu_napiecia_5.10
Vout2_1: C418.2 C419.2 C420.2 C421.2 C422.2 C423.2 C424.2 C425.2 C426.2 C427.2 C428.2 C429.2 L12.2 R448_U_Pomiar_pradu_napiecia_4.1 U64_U_Pomiar_pradu_napiecia_4.10
Vout2_2: C459.2 C460.2 C461.2 C462.2 C463.2 C464.2 C465.2 C466.2 C467.2 C468.2 C469.2 C470.2
Vout_1_Selector: C4.1 C5.1 C6.1 C7.1 C8.2 C9.2 C10.2 C11.2 C20.2 C21.2 C22.2 C23.2 C24.2 C25.2 C26.2 C27.2 R15.2 U4.7 U5.1 U5.8 | length 39.1
  L1 w0.5: v1(37.904,169.788) C4.1@38.991,169.788 ; v1(37.904,170.893) C4.1@38.991,170.893 ; v1(37.904,171.99) C4.1@38.991,171.99 ; v1(37.904,173.243) C5.1@38.991,173.243 ; v1(37.904,174.348) C5.1@38.991,174.348 ; v1(37.904,175.445) C5.1@38.991,175.445 ; v1(37.904,176.697) C7.1@38.991,176.697 ; v1(37.904,177.802) C7.1@38.991,177.802 ; v1(37.904,178.899) C7.1@38.991,178.899 ; v1(37.904,180.152) C6.1@38.991,180.152 ; v1(37.904,181.257) C6.1@38.991,181.257 ; v1(37.904,182.353) C6.1@38.991,182.353 ; C4.1@38.991,170.337 v1(40.078,170.337) ; C4.1@38.991,171.442 v1(40.078,171.442) ; C5.1@38.991,173.791 v1(40.078,173.791) ; C5.1@38.991,174.896 v1(40.078,174.896) ; C7.1@38.991,177.246 v1(40.078,177.246) ; C7.1@38.991,178.351 v1(40.078,178.351) ; C6.1@38.991,180.7 v1(40.078,180.7) ; C6.1@38.991,181.805 v1(40.078,181.805) ; v1(53.932,163.773) C20.2@55.019,163.774 ; v1(53.932,164.497) C20.2@55.019,164.497 ; v1(53.959,166.505) C27.2@55.046,166.505 ; v1(53.959,168.403) C22.2@55.046,168.403 ; v1(53.959,170.301) C21.2@55.046,170.301 ; v1(53.959,172.199) C24.2@55.046,172.199 ; v1(53.959,174.096) C25.2@55.046,174.096 ; v1(53.959,175.994) C23.2@55.046,175.994 ; v1(53.959,165.781) C27.2@55.046,165.781 ; v1(53.959,167.679) C22.2@55.046,167.679 ; v1(53.959,169.577) C21.2@55.046,169.577 ; v1(53.959,171.475) C24.2@55.046,171.475 ; v1(53.959,173.373) C25.2@55.046,173.373 ; v1(53.959,175.27) C23.2@55.046,175.27 ; v1(53.989,177.168) C26.2@55.076,177.168 ; v1(53.989,177.892) C26.2@55.076,177.892
  other v5: 50.48,171.336 49.821,172.073 49.233,172.838 50.481,172.838 49.233,177.161 50.481,177.161 49.821,177.926 50.48,178.663 46.94,180.658 47.599,181.395 46.939,182.16 48.188,182.16
  other v10: 49.06,174.6 49.06,175.4 48.36,183.921
Vout_2_Selector: C12.1 C13.1 C14.1 C15.1 C16.2 C17.2 C18.2 C19.2 C28.2 C29.2 C30.2 C31.2 C32.2 C33.2 C34.2 C35.2 R677.2 R678.2 U4.1 U4.8 U48.7 | length 40.8
  L1 w0.5: v1(37.823,183.811) C12.1@38.91,183.811 ; v1(37.823,184.916) C12.1@38.91,184.916 ; v1(37.823,186.012) C12.1@38.91,186.012 ; v1(37.823,187.256) C15.1@38.91,187.256 ; v1(37.823,188.361) C15.1@38.91,188.361 ; v1(37.823,189.458) C15.1@38.91,189.457 ; v1(37.823,190.701) C13.1@38.91,190.701 ; v1(37.823,191.806) C13.1@38.91,191.806 ; v1(37.823,192.903) C13.1@38.91,192.903 ; v1(37.823,194.146) C14.1@38.91,194.146 ; v1(37.823,195.251) C14.1@38.91,195.251 ; v1(37.823,196.348) C14.1@38.91,196.348 ; C12.1@38.91,184.359 v1(39.997,184.359) ; C12.1@38.91,185.464 v1(39.997,185.464) ; C15.1@38.91,187.804 v1(39.997,187.804) ; C15.1@38.91,188.909 v1(39.997,188.909) ; C13.1@38.91,191.249 v1(39.997,191.249) ; C13.1@38.91,192.354 v1(39.997,192.354) ; C14.1@38.91,194.694 v1(39.997,194.694) ; C14.1@38.91,195.799 v1(39.997,195.799) ; v5(43.658,191.22) R678.2@43.658,192.033 ; v5(44.716,191.22) R677.2@44.716,192.033 ; v1(53.971,179.205) C31.2@55.058,179.205 ; v1(53.971,179.929) C31.2@55.058,179.929 ; v1(53.971,181.103) C30.2@55.058,181.103 ; v1(53.971,181.827) C30.2@55.058,181.827 ; v1(53.971,183.001) C32.2@55.058,183.001 ; v1(53.971,183.725) C32.2@55.058,183.725 ; v1(53.971,184.899) C29.2@55.058,184.899 ; v1(53.971,185.623) C29.2@55.058,185.623 ; v1(53.971,186.796) C28.2@55.058,186.796 ; v1(53.971,187.52) C28.2@55.058,187.52 ; v1(53.971,188.694) C33.2@55.058,188.694 ; v1(53.971,189.418) C33.2@55.058,189.418 ; v1(53.971,190.592) C34.2@55.058,190.592 ; v1(53.971,191.316) C34.2@55.058,191.316 ; v1(53.997,192.534) C35.2@55.084,192.534 ; v1(53.996,193.258) C35.2@55.083,193.258
  other v5: 50.48,180.658 49.821,181.395 49.233,182.16 50.481,182.16 49.233,186.483 50.481,186.483 49.821,187.248 50.48,187.985 46.907,190.32 47.566,191.057 46.906,191.822 48.155,191.821
  other v10: 49.06,183.921 49.06,184.721 48.327,193.583
Vout_5V@10A_INA: L20.2 R448_U_Pomiar_pradu_napiecia_6.1 U64_U_Pomiar_pradu_napiecia_6.10
VPHY_FTDI: C661.2 C662.2 FB44.2 U55.4
VPLL_FTDI: C659.2 C660.2 FB43.2 U55.9
VREF+_1: C61.2 C62.2 FB3.2 U12.44
VREF+_2: C73.2 C74.2 FB5.2 U13.44
VREF+_3: C57.2 C58.2 FB2.2 U14.44
VVCO+_1: C86.2 C87.2 FB6.2 U12.39
VVCO+_2: C97.2 C98.2 FB7.2 U13.39
VVCO+_3: C68.2 C69.2 FB4.2 U14.39
WR_LMK_CLK_HF1_N: U1.AK5 U16.26
WR_LMK_CLK_HF1_P: U1.AJ5 U16.27
WR_LMK_CLK_HF2_N: U1.AK2 U16.32
  other v2: 191.397,289.539
WR_LMK_CLK_HF2_P: U1.AK3 U16.31
WR_LMK_CLK_HF3_N: U16.33
WR_LMK_CLK_HF3_P: U16.34
WR_LMK_CLK_HF4_N: U16.52
WR_LMK_CLK_HF4_P: U16.51
WR_LMK_CLK_HF5_N: U16.53
WR_LMK_CLK_HF5_P: U16.54
WR_LMK_CLK_HF6_N: U16.58
WR_LMK_CLK_HF6_P: U16.57
WR_LMK_CLK_HF7_N: U16.61
WR_LMK_CLK_HF7_P: U16.62
WR_LMK_CLK_IN_N: C594.2 R311.1 U16.2
WR_LMK_CLK_IN_P: C593.2 R311.2 U16.1
WR_LMK_CLK_LF_N: U16.15 U16.23
WR_LMK_CLK_LF_P: U16.14 U16.22
WR_Source_CLK_N: C594.1 U13.6
WR_Source_CLK_P: C593.1 U13.7